# Altium PCB Vibration_Datalogger.PcbDoc (part 3 of 7)
Units mm, origin at the board's own origin, x right, y up, seen from the top; angles counter-clockwise.
Board outline 75.58 x 57.4 mm, 4 copper layers (Top Layer, Int1 (GND), Int2 (PWR), Bottom Layer), stack 1.44 mm thick; 126 components, 59 nets, 413 pads, 160 vias.
Unrouted connection lines stored in the file: 53.
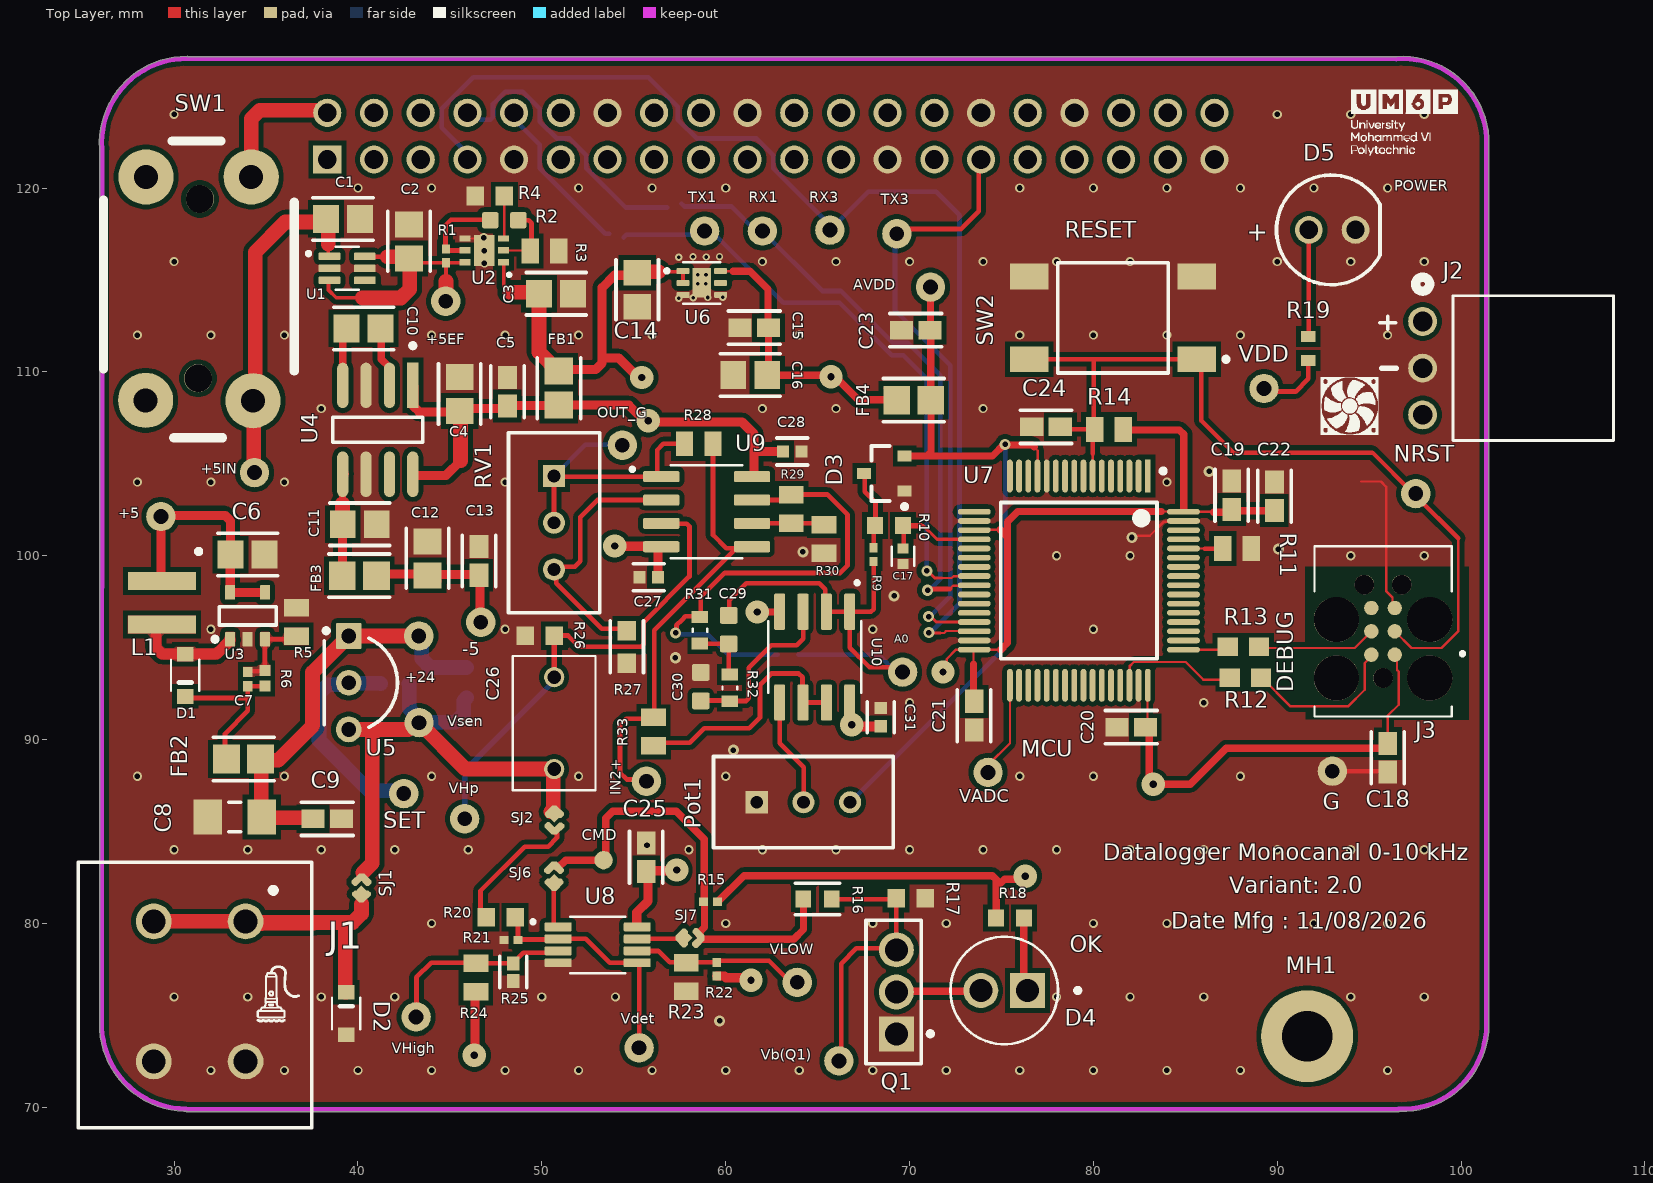
[diagram p0: Top Layer view]

## Part data (continued)
D3: "DIODE ARR SCHOTT 40V 200MA SOT23", Average Rectified Current=120mA, Capacitance=5pF, Case/Package=SOT, Forward Voltage=380mV, Max Forward Surge Current (Ifsm)=200mA, Max Operating Temperature=150°C, Max Power Dissipation=250mW, Max Repetitive Reverse Voltage (Vrrm)=40V, Max Reverse Leakage Current=1µA, Min Operating Temperature=-55°C, Package Quantity=3000, Ratings=AEC-Q101, Reverse Standoff Voltage=30V, Supplier Part Number 1=BAS4004E6327HTSA1DKR-ND, China RoHS=Compliant, ComponentLink1Description=https://datasheet.octopart.com:443/BAS4004E6327HTSA1-Infineon-datasheet-38586392.pdf?src-supplier=Newark, ComponentLink1URL=https://datasheet.octopart.com:443/BAS4004E6327HTSA1-Infineon-datasheet-38586392.pdf?src-supplier=Newark, ComponentLink2Description=https://datasheet.octopart.com:443/BAS4004E6327HTSA1-Infineon-datasheet-5318301.pdf?src-supplier=_legacy+Avnet, ComponentLink2URL=https://datasheet.octopart.com:443/BAS4004E6327HTSA1-Infineon-datasheet-5318301.pdf?src-supplier=_legacy+Avnet, ComponentLink3Description=https://datasheet.octopart.com:443/BAS4004E6327-Infineon-datasheet-537799.pdf?src-supplier=Farnell, ComponentLink3URL=https://datasheet.octopart.com:443/BAS4004E6327-Infineon-datasheet-537799.pdf?src-supplier=Farnell, ComponentLink4Description=https://datasheet.octopart.com:443/BAS4004E6327-Infineon-datasheet-7537246.pdf?src-supplier=Farnell, ComponentLink4URL=https://datasheet.octopart.com:443/BAS4004E6327-Infineon-datasheet-7537246.pdf?src-supplier=Farnell, ComponentLink5Description=https://datasheet.octopart.com:443/BAS40-04-Infineon-datasheet-578246.pdf?src-supplier=Farnell, ComponentLink5URL=https://datasheet.octopart.com:443/BAS40-04-Infineon-datasheet-578246.pdf?src-supplier=Farnell, ComponentLink6Description=https://datasheet.octopart.com:443/BAS40-04-Infineon-datasheet-645037.pdf?src-supplier=Farnell, ComponentLink6URL=https://datasheet.octopart.com:443/BAS40-04-Infineon-datasheet-645037.pdf?src-supplier=Farnell, ComponentLink7Description=https://datasheet.octopart.com:443/BAS4004E6327-Infineon-datasheet-21681.pdf?src-supplier=DigiKey, ComponentLink7URL=https://datasheet.octopart.com:443/BAS4004E6327-Infineon-datasheet-21681.pdf?src-supplier=DigiKey, ComponentLink8Description=http://sigma.octopart.com:80/conflict_mineral_statement/Infineon-company-51.pdf?src-supplier=Compliance+Statements, ComponentLink8URL=http://sigma.octopart.com:80/conflict_mineral_statement/Infineon-company-51.pdf?src-supplier=Compliance+Statements, ComponentLink9Description=http://sigma.octopart.com:80/reach_statement/International-Rectifier-company-55.pdf?src-supplier=Compliance+Statements, ComponentLink9URL=http://sigma.octopart.com:80/reach_statement/International-Rectifier-company-55.pdf?src-supplier=Compliance+Statements, ComponentLink10Description=http://sigma.octopart.com:80/rohs_statement/International-Rectifier-company-54.pdf?src-supplier=Compliance+Statements, ComponentLink10URL=http://sigma.octopart.com:80/rohs_statement/International-Rectifier-company-54.pdf?src-supplier=Compliance+Statements, Contact Plating=Tin, Country of Origin="Austria, Mainland China", Element Configuration=Dual, Export Control Classification Number (ECCN) Code=EAR99, Forward Current=120mA, Halogen Free="Not Halogen Free", Harmonized Tariff Schedule (HTS) Code=8541.10.00.70, Height=900µm, Introduction Date=1996-02-01, Lead Free="Lead Free", Length=2.9mm, Lifecycle Status=Production, Max Output Current=120mA, Max Reverse Voltage (DC)=40V, Max Surge Current=200mA, Min Breakdown Voltage=40V, Mount="Surface Mount", Number of Elements=2, Number of Pins=3, Number of Terminals=3, Packaging="Tape & Reel", Peak Non-Repetitive Surge Current=200mA, Peak Reverse Current=1µA, Radiation Hardening=No, REACH SVHC=Yes, Recovery Time=100ps, Reverse Recovery Time=100ps, Reverse Voltage=40V, Schedule B="8541100070|8541100070|8541100070, 8541100080|8541100080|8541100080|8541100080|8541100080|8541100080|8541100080|8541100080|8541100080|8541100080|8541100080|8541100080|8541100080|8541100080|8541100080|8541100080|8541100080, 8541100080|8541100080|8541100080|8541100080|8541100080|8541100080|8541100080|8541100080|8541100080|8541100080|8541100080|8541100080|8541100080|8541100080|8541100080|8541100080|8541100080|8541100080, 8541100080|8541100080|8541100080|8541100080|8541100080|8541100080|8541100080|8541100080|8541100080|8541100080|8541100080|8541100080|8541100080|8541100080|8541100080|8541100080|8541100080|8541100080|8541100080", Supplier 1=DigiKey, Termination=SMD/SMT, Width=1.3mm
D4: "LED GREEN DIFFUSED T/H", Supplier Part Number 1=160-1142-ND, Supplier 1=DigiKey
D5: "Single Color LED, Blue, Diffused, T-1 3/4, 4.9mm", Case/Package=Radial, Color=Blue, Forward Current=100mA, Forward Voltage=3.2V, Manufacturer="Wurth Elektronik", Manufacturer Lifecycle Status=ACTIVE, Max Operating Temperature=85°C, Max Reverse Voltage (DC)=5V, Min Operating Temperature=-40°C, Supplier Part Number 1=732-5015-ND, Test Current=20mA, Category=LEDs, ComponentLink1Description=https://datasheet.octopart.com:443/151051BS04000-Wurth-Elektronik-datasheet-168474691.pdf?src-supplier=Wurth+Elektronik, ComponentLink1URL=https://datasheet.octopart.com:443/151051BS04000-Wurth-Elektronik-datasheet-168474691.pdf?src-supplier=Wurth+Elektronik, ComponentLink2Description=https://datasheet.octopart.com:443/151051BS04000-W%C3%BCrth-Elektronik-datasheet-41196471.pdf?src-supplier=Future+Electronics, ComponentLink2URL=https://datasheet.octopart.com:443/151051BS04000-W%C3%BCrth-Elektronik-datasheet-41196471.pdf?src-supplier=Future+Electronics, ComponentLink3Description=https://datasheet.octopart.com:443/151051BS04000-W%C3%BCrth-Elektronik-datasheet-15983823.pdf?src-supplier=HQonline, ComponentLink3URL=https://datasheet.octopart.com:443/151051BS04000-W%C3%BCrth-Elektronik-datasheet-15983823.pdf?src-supplier=HQonline, Dominant Wavelength=470nm, Height=8.6mm, Length=5mm, Lens Size=5mm, Lens Style="Circular, Diffused, Round", Lifecycle Status=Production, Luminous Intensity=500mcd, Manufacturer Part Number=151051BS04000, Mount="Through Hole", Packaging=Bulk, Peak Wavelength=465nm, REACH SVHC=Unknown, Supplier 1=DigiKey, Viewing Angle=40°, Wavelength=470nm, Width=5mm, YEOL="1 = Estimated lifetime > 10 years"
FB1 FB2 FB3: "FERRITE BEAD 220 OHM 0805 1LN", Case Code (Imperial)=0805, Case Code (Metric)=2012, Current=2A, DC Resistance (DCR)=50mΩ, Frequency=100MHz, Manufacturer=Murata, Manufacturer Package Identifier="0805 (2012 metric)", Max Operating Temperature=125°C, Min Operating Temperature=-55°C, Resistance=220Ω, Series Resistance=45mΩ, Supplier Part Number 1=490-1054-1-ND, Tolerance=25%, Case/Package=0805, Category="Ferrite Beads and Chips", ComponentLink1Description=https://datasheet.octopart.com:443/BLM21PG221SN1D-Murata-datasheet-114786051.pdf?src-supplier=Upverter, ComponentLink1URL=https://datasheet.octopart.com:443/BLM21PG221SN1D-Murata-datasheet-114786051.pdf?src-supplier=Upverter, ComponentLink2Description=https://datasheet.octopart.com:443/BLM21PG221SN1D-Murata-datasheet-12522583.pdf?src-supplier=Upverter, ComponentLink2URL=https://datasheet.octopart.com:443/BLM21PG221SN1D-Murata-datasheet-12522583.pdf?src-supplier=Upverter, ComponentLink3Description=https://datasheet.octopart.com:443/BLM21PG221SN1D-Murata-datasheet-10083551.pdf?src-supplier=Upverter, ComponentLink3URL=https://datasheet.octopart.com:443/BLM21PG221SN1D-Murata-datasheet-10083551.pdf?src-supplier=Upverter, ComponentLink4Description=https://datasheet.octopart.com:443/BLM21PG221SN1D-Murata-datasheet-8508678.pdf?src-supplier=Upverter, ComponentLink4URL=https://datasheet.octopart.com:443/BLM21PG221SN1D-Murata-datasheet-8508678.pdf?src-supplier=Upverter, ComponentLink5Description=https://datasheet.octopart.com:443/BLM21PG221SN1D-Murata-datasheet-166171482.pdf?src-supplier=IHS, ComponentLink5URL=https://datasheet.octopart.com:443/BLM21PG221SN1D-Murata-datasheet-166171482.pdf?src-supplier=IHS, ComponentLink6Description=https://datasheet.octopart.com:443/BLM21PG221SN1D-Murata-datasheet-11743916.pdf?src-supplier=SOS+electronic, ComponentLink6URL=https://datasheet.octopart.com:443/BLM21PG221SN1D-Murata-datasheet-11743916.pdf?src-supplier=SOS+electronic, ComponentLink7Description=https://datasheet.octopart.com:443/BLM21PG221SN1D-Murata-datasheet-37129980.pdf?src-supplier=element14+APAC, ComponentLink7URL=https://datasheet.octopart.com:443/BLM21PG221SN1D-Murata-datasheet-37129980.pdf?src-supplier=element14+APAC, ComponentLink8Description=https://datasheet.octopart.com:443/BLM21PG221SN1D-Murata-datasheet-53019.pdf?src-supplier=TME, ComponentLink8URL=https://datasheet.octopart.com:443/BLM21PG221SN1D-Murata-datasheet-53019.pdf?src-supplier=TME, ComponentLink9Description=https://datasheet.octopart.com:443/BLM21PG221SN1D-Murata-datasheet-135086726.pdf?src-supplier=TME, ComponentLink9URL=https://datasheet.octopart.com:443/BLM21PG221SN1D-Murata-datasheet-135086726.pdf?src-supplier=TME, ComponentLink10Description=https://datasheet.octopart.com:443/BLM21PG221SN1D-Murata-datasheet-8359900.pdf?src-supplier=_legacy+Avnet, ComponentLink10URL=https://datasheet.octopart.com:443/BLM21PG221SN1D-Murata-datasheet-8359900.pdf?src-supplier=_legacy+Avnet, ComponentLink11Description=https://datasheet.octopart.com:443/BLM21PG221SN1D-Murata-datasheet-554271.pdf?src-supplier=_legacy+Avnet, ComponentLink11URL=https://datasheet.octopart.com:443/BLM21PG221SN1D-Murata-datasheet-554271.pdf?src-supplier=_legacy+Avnet, ComponentLink12Description=https://datasheet.octopart.com:443/BLM21PG221SN1D-Murata-datasheet-141258121.pdf?src-supplier=Ciiva, ComponentLink12URL=https://datasheet.octopart.com:443/BLM21PG221SN1D-Murata-datasheet-141258121.pdf?src-supplier=Ciiva, ComponentLink13Description=https://datasheet.octopart.com:443/BLM21PG221SN1D-Murata-datasheet-138707416.pdf?src-supplier=Ciiva, ComponentLink13URL=https://datasheet.octopart.com:443/BLM21PG221SN1D-Murata-datasheet-138707416.pdf?src-supplier=Ciiva, ComponentLink14Description=https://datasheet.octopart.com:443/BLM21PG221SN1D-Murata-datasheet-83134203.pdf?src-supplier=Megastar, ComponentLink14URL=https://datasheet.octopart.com:443/BLM21PG221SN1D-Murata-datasheet-83134203.pdf?src-supplier=Megastar, ComponentLink15Description=https://datasheet.octopart.com:443/BLM21PG221SN1D-Murata-datasheet-62086381.pdf?src-supplier=Future+Electronics, ComponentLink15URL=https://datasheet.octopart.com:443/BLM21PG221SN1D-Murata-datasheet-62086381.pdf?src-supplier=Future+Electronics, ComponentLink16Description=https://datasheet.octopart.com:443/BLM21PG221SN1D-Murata-datasheet-14066484.pdf?src-supplier=iiiC, ComponentLink16URL=https://datasheet.octopart.com:443/BLM21PG221SN1D-Murata-datasheet-14066484.pdf?src-supplier=iiiC, ComponentLink17Description=https://datasheet.octopart.com:443/BLM21PG221SN1D-Murata-datasheet-8197962.pdf?src-supplier=Jameco, ComponentLink17URL=https://datasheet.octopart.com:443/BLM21PG221SN1D-Murata-datasheet-8197962.pdf?src-supplier=Jameco, ComponentLink18Description=https://datasheet.octopart.com:443/BLM21PG221SN1D-Murata-datasheet-153769.pdf?src-supplier=Mouser, ComponentLink18URL=https://datasheet.octopart.com:443/BLM21PG221SN1D-Murata-datasheet-153769.pdf?src-supplier=Mouser, ComponentLink19Description=http://sigma.octopart.com:80/reach_statement/Murata-company-16.pdf?src-supplier=Compliance+Statements, ComponentLink19URL=http://sigma.octopart.com:80/reach_statement/Murata-company-16.pdf?src-supplier=Compliance+Statements, Contact Plating=Tin, Core Material=Ferrite, Current Rating=2A, DC Current=2A, Depth=1.25mm, Height=850µm, Impedance=220Ω, Lead Free="Lead Free", Length=2mm, Lifecycle Status=Production, Manufacturer Part Number=BLM21PG221SN1D, Material="Ferrite, Steel", Max Current Rating=2A, Max DC Current=2A, Max Frequency=100MHz, Military Standard=Not, Mount="Surface Mount", Number of Circuits=1, Number of Lines=1, Number of Pins=2, Number of Terminals=2, Packaging="Tape and Reel", Radiation Hardening=No, REACH SVHC=Yes, RMS Current (Irms)=2A, Schedule B="8504500000, 8504500000|8504500000|8504500000|8504500000|8504500000", Shielding=Unshielded, Supplier 1=DigiKey, Termination=SMD/SMT, Test Frequency=100MHz, Width=1.25mm
FB4: library part CMP-0686-00639-3, "Chip Ferrite Bead, 0805, 600Ω @ 100MHz, 0.2Ω, 25%, 700mA", Case Code (Imperial)=0805, Case Code (Metric)=2012, Current Rating=600mA, DC Current=200mA, DC Resistance (DCR)=210mR, ESR (Equivalent Series Resistance)=600R, Frequency=100MHz, Max Current Rating=700mA, Max Operating Temperature=125°C, Min Operating Temperature=-55°C, Package Quantity=1, Temperature Coefficient=10ppm/°C, Tolerance=25%, Case/Package=0805, Conductor Material=Copper, Core Material=Ferrite, Depth=1.25mm, Height=0.85mm, Impedance=600R, Lead Free="Lead Free", Length=2mm, Material=Steel, Max DC Current=200mA, Number of Circuits=1, Number of Lines=1, Number of Pins=2, Packaging="Tape and Reel", Radiation Hardening=No, REACH SVHC="No SVHC", RoHS Compliant=Yes, Shielding=Unshielded, Termination=SMD/SMT, Test Frequency=100MHz, Width=1.25mm
J1: "WR-TBL Terminal block - Screwless Push IN - THT", Current Rating=10A, Manufacturer="Wurth Elektronik", Manufacturer Lifecycle Status=ACTIVE, Max Operating Temperature=120°C, Min Operating Temperature=-30°C, Supplier Part Number 1=732-11084-ND, Voltage Rating=300V, Category="Terminal Blocks", ComponentLink1Description=https://datasheet.octopart.com:443/691411410002-W%C3%BCrth-Elektronik-datasheet-117282770.pdf?src-supplier=HQonline, ComponentLink1URL=https://datasheet.octopart.com:443/691411410002-W%C3%BCrth-Elektronik-datasheet-117282770.pdf?src-supplier=HQonline, ComponentLink2Description=https://datasheet.octopart.com:443/691411410002-Wurth-Elektronik-datasheet-190368166.pdf?src-supplier=Wurth+Elektronik, ComponentLink2URL=https://datasheet.octopart.com:443/691411410002-Wurth-Elektronik-datasheet-190368166.pdf?src-supplier=Wurth+Elektronik, Contact Material="Nickel, Tin", Height=14mm, Lead Pitch=7.62mm, Length=14.24mm, Lifecycle Status=Production, Manufacturer Part Number=691411410002, Number of Contacts=2, Number of Pins=2, Number of Rows=1, Packaging=Box, Pitch=7.62mm, Supplier 1=DigiKey, YEOL="1 = Estimated lifetime > 10 years"
J2: "CONN HEADER R/A 3POS 2.54MM", Color=Black, Contact Resistance=20mΩ, Current Rating=4A, Insulation Resistance=50GΩ, Manufacturer Lifecycle Status=ACTIVE, Max Operating Temperature=75°C, Max Voltage Rating (DC)=250.25kV, Min Operating Temperature=-40°C, Ratings=CSA, Supplier Part Number 1=WM50015-03-ND, Voltage Rating=250V, China RoHS=Compliant, ComponentLink1Description=https://datasheet.octopart.com:443/22-28-8032-Molex-datasheet-158885819.pdf?src-supplier=Newark, ComponentLink1URL=https://datasheet.octopart.com:443/22-28-8032-Molex-datasheet-158885819.pdf?src-supplier=Newark, ComponentLink2Description=https://datasheet.octopart.com:443/22-28-8032-Molex-datasheet-193086131.pdf?src-supplier=JRH+Electronics, ComponentLink2URL=https://datasheet.octopart.com:443/22-28-8032-Molex-datasheet-193086131.pdf?src-supplier=JRH+Electronics, ComponentLink3Description=https://datasheet.octopart.com:443/22-28-8032-Molex-datasheet-16301320.pdf?src-supplier=Molex, ComponentLink3URL=https://datasheet.octopart.com:443/22-28-8032-Molex-datasheet-16301320.pdf?src-supplier=Molex, ComponentLink4Description=https://sigma.octopart.com:443/12577388/technical_drawing/Molex-22-28-8032.pdf?src-supplier=Molex, ComponentLink4URL=https://sigma.octopart.com:443/12577388/technical_drawing/Molex-22-28-8032.pdf?src-supplier=Molex, ComponentLink5Description=https://datasheet.octopart.com:443/022288032-Molex-datasheet-8335722.pdf?src-supplier=Molex, ComponentLink5URL=https://datasheet.octopart.com:443/022288032-Molex-datasheet-8335722.pdf?src-supplier=Molex, ComponentLink6Description=https://datasheet.octopart.com:443/22-28-8032-Molex-datasheet-154747357.pdf?src-supplier=Master+Electronics, ComponentLink6URL=https://datasheet.octopart.com:443/22-28-8032-Molex-datasheet-154747357.pdf?src-supplier=Master+Electronics, ComponentLink7Description=https://datasheet.octopart.com:443/22-28-8032-Molex-datasheet-140181327.pdf?src-supplier=RS+(Formerly+Allied+Electronics), ComponentLink7URL=https://datasheet.octopart.com:443/22-28-8032-Molex-datasheet-140181327.pdf?src-supplier=RS+(Formerly+Allied+Electronics), ComponentLink8Description=https://datasheet.octopart.com:443/22-28-8032-Molex-datasheet-120146392.pdf?src-supplier=RS+(Formerly+Allied+Electronics), ComponentLink8URL=https://datasheet.octopart.com:443/22-28-8032-Molex-datasheet-120146392.pdf?src-supplier=RS+(Formerly+Allied+Electronics), ComponentLink9Description=https://datasheet.octopart.com:443/22-28-8032-Molex-datasheet-62061378.pdf?src-supplier=RS+(Formerly+Allied+Electronics), ComponentLink9URL=https://datasheet.octopart.com:443/22-28-8032-Molex-datasheet-62061378.pdf?src-supplier=RS+(Formerly+Allied+Electronics), ComponentLink10Description=https://datasheet.octopart.com:443/22-28-8032-Molex-datasheet-62103598.pdf?src-supplier=Electro+Sonic, ComponentLink10URL=https://datasheet.octopart.com:443/22-28-8032-Molex-datasheet-62103598.pdf?src-supplier=Electro+Sonic, ComponentLink11Description=https://datasheet.octopart.com:443/22-28-8032-Molex-datasheet-37169007.pdf?src-supplier=Electro+Sonic, ComponentLink11URL=https://datasheet.octopart.com:443/22-28-8032-Molex-datasheet-37169007.pdf?src-supplier=Electro+Sonic, ComponentLink12Description=https://datasheet.octopart.com:443/22-28-8032-Molex-datasheet-23709161.pdf?src-supplier=Electro+Sonic, ComponentLink12URL=https://datasheet.octopart.com:443/22-28-8032-Molex-datasheet-23709161.pdf?src-supplier=Electro+Sonic, ComponentLink13Description=https://datasheet.octopart.com:443/0022288032-Molex-datasheet-11837251.pdf?src-supplier=Arrow+Electronics, ComponentLink13URL=https://datasheet.octopart.com:443/0022288032-Molex-datasheet-11837251.pdf?src-supplier=Arrow+Electronics, ComponentLink14Description=https://datasheet.octopart.com:443/22-28-8032-Molex-datasheet-147203.pdf?src-supplier=DigiKey, ComponentLink14URL=https://datasheet.octopart.com:443/22-28-8032-Molex-datasheet-147203.pdf?src-supplier=DigiKey, ComponentLink15Description=http://sigma.octopart.com:80/16301321/rohs_statement/Molex-22-28-8032.pdf?src-supplier=Compliance+Statements, ComponentLink15URL=http://sigma.octopart.com:80/16301321/rohs_statement/Molex-22-28-8032.pdf?src-supplier=Compliance+Statements, ComponentLink16Description=http://sigma.octopart.com:80/reach_statement/Molex-company-74.pdf?src-supplier=Compliance+Statements, ComponentLink16URL=http://sigma.octopart.com:80/reach_statement/Molex-company-74.pdf?src-supplier=Compliance+Statements, ComponentLink17Description=http://sigma.octopart.com:80/rohs_statement/Molex-company-73.pdf?src-supplier=Compliance+Statements, ComponentLink17URL=http://sigma.octopart.com:80/rohs_statement/Molex-company-73.pdf?src-supplier=Compliance+Statements, ComponentLink18Description=http://sigma.octopart.com:80/conflict_mineral_statement/Molex-company-72.pdf?src-supplier=Compliance+Statements, ComponentLink18URL=http://sigma.octopart.com:80/conflict_mineral_statement/Molex-company-72.pdf?src-supplier=Compliance+Statements, Connector Type="Male Pin", Contact Material=Brass, Contact Mating Length=6.1976mm, Contact Plating=Gold, Country of Origin=US, Export Control Classification Number (ECCN) Code=EAR99, Gender=Male, Glow Wire Compliant=Non-compliant, Harmonized Tariff Schedule (HTS) Code=8536.69.40.40, Housing Color=Black, Housing Material=Thermoplastic, Introduction Date=1994-12-01, Lead Free="Lead Free", Length=7.62mm, Lifecycle Status=Production, Mount="Through Hole", Number of Circuits=3, Number of Contacts=3, Number of Pins=3, Number of Positions=3, Number of Rows=1, Orientation="Right Angle", Packaging=Bulk, Pitch=2.54mm, Plating=Tin, Plating Thickness=381nm, REACH SVHC=Yes, Supplier 1=DigiKey, Terminal Pitch=2.54mm, Termination=Solder
J3: "6-pin Needle Adapter (8.06.16)"
J4: "CONN SOCKET 40POS 0.1 GOLD PCB", Supplier Part Number 1=SAM10459-ND, Supplier 1=DigiKey
L1: "10 µH Shielded Molded Inductor 2.7 A", Ambient Temperature Range High=85°C, Ambient Temperature Range Low=-40°C, Current Rating=2.7A, DC Resistance (DCR)=100.8mΩ, Inductance=10µH, Inductance Tolerance=20%, Manufacturer="Wurth Elektronik", Manufacturer Lifecycle Status=ACTIVE, Max Operating Temperature=125°C, Saturation Current=3A, Self Resonant Frequency=15MHz, Series Resistance=110mΩ, Supplier Part Number 1=732-11206-1-ND, Test Frequency=100kHz, Category="Fixed Inductors", ComponentLink1Description=https://datasheet.octopart.com:443/74438357100-Wurth-Elektronik-datasheet-168490252.pdf?src-supplier=Wurth+Elektronik, ComponentLink1URL=https://datasheet.octopart.com:443/74438357100-Wurth-Elektronik-datasheet-168490252.pdf?src-supplier=Wurth+Elektronik, ComponentLink2Description=https://datasheet.octopart.com:443/74438357100-W%C3%BCrth-Elektronik-datasheet-142051541.pdf?src-supplier=Upverter, ComponentLink2URL=https://datasheet.octopart.com:443/74438357100-W%C3%BCrth-Elektronik-datasheet-142051541.pdf?src-supplier=Upverter, ComponentLink3Description=https://datasheet.octopart.com:443/74438357100-W%C3%BCrth-Elektronik-datasheet-104453325.pdf?src-supplier=element14+APAC, ComponentLink3URL=https://datasheet.octopart.com:443/74438357100-W%C3%BCrth-Elektronik-datasheet-104453325.pdf?src-supplier=element14+APAC, Height=3.1mm, Length=4mm, Lifecycle Status=Production, Manufacturer Part Number=74438357100, Min Operating Temperature=-40°C, Number of Pins=2, RMS Current (Irms)=2.7A, Supplier 1=DigiKey, Tolerance=20%, Width=4mm, YEOL="1 = Estimated lifetime > 10 years"
MH1: "Mounting Holes M2.5 PTH", Diamétre externe=5mm, Diamétre interne=M2.5
Pot1 RV1: "TRIMMER 10K OHM 0.5W PC PIN TOP", Case Code (Imperial)=0603, Case Code (Metric)=1608, Color=Blue, Insulation Resistance=1GΩ, Manufacturer=Bourns, Max Operating Temperature=125°C, Max Power Dissipation=500mW, Min Operating Temperature=-55°C, Resistance=10kΩ, Supplier Part Number 1=3296W-103LF-ND, Temperature Coefficient=100ppm/°C, Tolerance=10%, Voltage Rating=75V, Voltage Rating (AC)=300V, Case/Package=0603, Category="Variable Resistors and Potentiometers", China RoHS=Non-Compliant, ComponentLink1Description=https://datasheet.octopart.com:443/3296W-1-103LF-Bourns-datasheet-154325949.pdf?src-supplier=Newark, ComponentLink1URL=https://datasheet.octopart.com:443/3296W-1-103LF-Bourns-datasheet-154325949.pdf?src-supplier=Newark, ComponentLink2Description=https://datasheet.octopart.com:443/3296W-1-103LF-Bourns-datasheet-134530165.pdf?src-supplier=Upverter, ComponentLink2URL=https://datasheet.octopart.com:443/3296W-1-103LF-Bourns-datasheet-134530165.pdf?src-supplier=Upverter, ComponentLink3Description=https://datasheet.octopart.com:443/3296W-1-103LF-Bourns-datasheet-8754025.pdf?src-supplier=Farnell, ComponentLink3URL=https://datasheet.octopart.com:443/3296W-1-103LF-Bourns-datasheet-8754025.pdf?src-supplier=Farnell, ComponentLink4Description=https://datasheet.octopart.com:443/3296W-1-103LF-Bourns-datasheet-9257.pdf?src-supplier=Farnell, ComponentLink4URL=https://datasheet.octopart.com:443/3296W-1-103LF-Bourns-datasheet-9257.pdf?src-supplier=Farnell, ComponentLink5Description=https://datasheet.octopart.com:443/3296W-1-103LF-Bourns-datasheet-8458046.pdf?src-supplier=Farnell, ComponentLink5URL=https://datasheet.octopart.com:443/3296W-1-103LF-Bourns-datasheet-8458046.pdf?src-supplier=Farnell, ComponentLink6Description=https://datasheet.octopart.com:443/3296W-1-103LF-Bourns-datasheet-6152.pdf?src-supplier=Farnell, ComponentLink6URL=https://datasheet.octopart.com:443/3296W-1-103LF-Bourns-datasheet-6152.pdf?src-supplier=Farnell, ComponentLink7Description=https://datasheet.octopart.com:443/3296W-1-103LF-Bourns-datasheet-528316.pdf?src-supplier=Farnell, ComponentLink7URL=https://datasheet.octopart.com:443/3296W-1-103LF-Bourns-datasheet-528316.pdf?src-supplier=Farnell, ComponentLink8Description=https://datasheet.octopart.com:443/3296W-1-103LF-Bourns-datasheet-62345832.pdf?src-supplier=element14+APAC, ComponentLink8URL=https://datasheet.octopart.com:443/3296W-1-103LF-Bourns-datasheet-62345832.pdf?src-supplier=element14+APAC, ComponentLink9Description=https://datasheet.octopart.com:443/3296W-1-103LF-Bourns-datasheet-25360155.pdf?src-supplier=Future+Electronics, ComponentLink9URL=https://datasheet.octopart.com:443/3296W-1-103LF-Bourns-datasheet-25360155.pdf?src-supplier=Future+Electronics, ComponentLink10Description=https://datasheet.octopart.com:443/3296W-1-103LF-Bourns-datasheet-154729564.pdf?src-supplier=Electro+Sonic, ComponentLink10URL=https://datasheet.octopart.com:443/3296W-1-103LF-Bourns-datasheet-154729564.pdf?src-supplier=Electro+Sonic, ComponentLink11Description=https://datasheet.octopart.com:443/3296W-1-103LF-Bourns-datasheet-8359740.pdf?src-supplier=_legacy+Avnet, ComponentLink11URL=https://datasheet.octopart.com:443/3296W-1-103LF-Bourns-datasheet-8359740.pdf?src-supplier=_legacy+Avnet, ComponentLink12Description=https://datasheet.octopart.com:443/3296W-1-103LF-Bourns-datasheet-170576125.pdf?src-supplier=Burklin+Elektronik, ComponentLink12URL=https://datasheet.octopart.com:443/3296W-1-103LF-Bourns-datasheet-170576125.pdf?src-supplier=Burklin+Elektronik, ComponentLink13Description=https://datasheet.octopart.com:443/3296W-1-103LF-Bourns-datasheet-14175298.pdf?src-supplier=iiiC, ComponentLink13URL=https://datasheet.octopart.com:443/3296W-1-103LF-Bourns-datasheet-14175298.pdf?src-supplier=iiiC, ComponentLink14Description=https://datasheet.octopart.com:443/3296W-1-103LF-Bourns-datasheet-7277272.pdf?src-supplier=Jameco, ComponentLink14URL=https://datasheet.octopart.com:443/3296W-1-103LF-Bourns-datasheet-7277272.pdf?src-supplier=Jameco, ComponentLink15Description=http://sigma.octopart.com:80/conflict_mineral_statement/Bourns-company-36.pdf?src-supplier=Compliance+Statements, ComponentLink15URL=http://sigma.octopart.com:80/conflict_mineral_statement/Bourns-company-36.pdf?src-supplier=Compliance+Statements, Composition=Cermet, Contact Plating=Tin, Country of Origin="Costa Rica", Depth=4.83mm, Export Control Classification Number (ECCN) Code=EAR99, Harmonized Tariff Schedule (HTS) Code=8533.40.80.50, Height=10.03mm, Introduction Date=2004-09-13, Lead Diameter=510µm, Lead Free="Lead Free", Lead Length=6.4mm, Length=9.53mm, Lifecycle Status=Production, Manufacturer Part Number=3296W-1-103LF, Military Standard=Not, Mount="Surface Mount", Number of Terminals=3, Number of Turns=25, Packaging="Tape and Reel", Power Rating=500mW, Radiation Hardening=No, REACH SVHC=No, Schedule B="8533400080, 8533400080|8533400080, 8533400080|8533400080|8533400080, 8533400080|8533400080|8533400080|8533400080", Supplier 1=DigiKey, Taper=Linear, Termination=Pin, Voltage Rating (DC)=300V, Weight=2.012816mg, Width=4.83mm, Working Voltage=300V
Q1: library part CMP-1048-01269-2, Case/Package=TO-225, Collector Base Voltage (VCBO)=80V, Collector Emitter Saturation Voltage=500mV, Current Rating=1.5A, Emitter Base Voltage (VEBO)=5V, Manufacturer Lifecycle Status=ACTIVE, Max Junction Temperature (Tj)=150°C, Max Power Dissipation=1.25W, Min Operating Temperature=-55°C, Collector Emitter Breakdown Voltage=80V, Collector Emitter Voltage (VCEO)=80V, Contact Plating=Tin, Element Configuration=Single, Height=11.04mm, hFE Min=25, Lead Free="Lead Free", Length=7.74mm, Lifecycle Status=Production, Max Collector Current=1.5A, Max Operating Temperature=150°C, NexarPartId=354669, Number of Elements=1, Number of Pins=3, Packaging=Bulk, Polarity=NPN, Power Dissipation=1.25W, Radiation Hardening=No, REACH SVHC="No SVHC", RoHS=Compliant, Schedule B="8541290080, 8541290080", Voltage Rating (DC)=80V, Weight=4.535924g, Width=2.66mm
R1: "RES SMD 33K OHM 0.1% 1/16W 0402", Case Code (Imperial)=0402, Case Code (Metric)=1005, Manufacturer=Panasonic, Manufacturer Lifecycle Status=ACTIVE, Manufacturer Part Number=ERA2AEB333X, Max Operating Temperature=155°C, Max Power Dissipation=63mW, Min Operating Temperature=-55°C, Ratings=AEC-Q200, Resistance=33kΩ, Temperature Coefficient=25ppm/°C, Tolerance=0.1%, Voltage Rating=25V, Working Voltage=50V, Case/Package=0402, Category="Chip SMD Resistors", China RoHS=Non-Compliant, ComponentLink1Description=https://datasheet.octopart.com:443/ERA2AEB333X-Panasonic-datasheet-62287448.pdf?src-supplier=element14+APAC, ComponentLink1URL=https://datasheet.octopart.com:443/ERA2AEB333X-Panasonic-datasheet-62287448.pdf?src-supplier=element14+APAC, ComponentLink2Description=https://datasheet.octopart.com:443/ERA-2AEB333X-Panasonic-datasheet-61114971.pdf?src-supplier=element14+APAC, ComponentLink2URL=https://datasheet.octopart.com:443/ERA-2AEB333X-Panasonic-datasheet-61114971.pdf?src-supplier=element14+APAC, ComponentLink3Description=https://datasheet.octopart.com:443/ERA2AEB333X-Panasonic-datasheet-13266200.pdf?src-supplier=Electro+Sonic, ComponentLink3URL=https://datasheet.octopart.com:443/ERA2AEB333X-Panasonic-datasheet-13266200.pdf?src-supplier=Electro+Sonic, ComponentLink4Description=https://datasheet.octopart.com:443/ERA-2AEB333X-Panasonic-datasheet-33006989.pdf?src-supplier=Electro+Sonic, ComponentLink4URL=https://datasheet.octopart.com:443/ERA-2AEB333X-Panasonic-datasheet-33006989.pdf?src-supplier=Electro+Sonic, ComponentLink5Description=https://datasheet.octopart.com:443/ERA-2AEB333X-Panasonic-datasheet-46744048.pdf?src-supplier=Electro+Sonic, ComponentLink5URL=https://datasheet.octopart.com:443/ERA-2AEB333X-Panasonic-datasheet-46744048.pdf?src-supplier=Electro+Sonic, ComponentLink6Description=https://datasheet.octopart.com:443/ERA2AEB333X-Panasonic-datasheet-12510007.pdf?src-supplier=Future+Electronics, ComponentLink6URL=https://datasheet.octopart.com:443/ERA2AEB333X-Panasonic-datasheet-12510007.pdf?src-supplier=Future+Electronics, ComponentLink7Description=https://datasheet.octopart.com:443/ERA2AEB333X-Panasonic-datasheet-11763931.pdf?src-supplier=Future+Electronics, ComponentLink7URL=https://datasheet.octopart.com:443/ERA2AEB333X-Panasonic-datasheet-11763931.pdf?src-supplier=Future+Electronics, ComponentLink8Description=https://datasheet.octopart.com:443/ERA2AEB333X-Panasonic-datasheet-10840895.pdf?src-supplier=Future+Electronics, ComponentLink8URL=https://datasheet.octopart.com:443/ERA2AEB333X-Panasonic-datasheet-10840895.pdf?src-supplier=Future+Electronics, ComponentLink9Description=https://datasheet.octopart.com:443/ERA2AEB333X-Panasonic-datasheet-8367715.pdf?src-supplier=Future+Electronics, ComponentLink9URL=https://datasheet.octopart.com:443/ERA2AEB333X-Panasonic-datasheet-8367715.pdf?src-supplier=Future+Electronics, ComponentLink10Description=https://datasheet.octopart.com:443/ERA2AEB333X-Panasonic-datasheet-5392808.pdf?src-supplier=Future+Electronics, ComponentLink10URL=https://datasheet.octopart.com:443/ERA2AEB333X-Panasonic-datasheet-5392808.pdf?src-supplier=Future+Electronics, ComponentLink11Description=https://datasheet.octopart.com:443/ERA2AEB333X-Panasonic-datasheet-136531316.pdf?src-supplier=Newark, ComponentLink11URL=https://datasheet.octopart.com:443/ERA2AEB333X-Panasonic-datasheet-136531316.pdf?src-supplier=Newark, ComponentLink12Description=https://datasheet.octopart.com:443/ERA2AEB333X-Panasonic---ECG-datasheet-22087624.pdf?src-supplier=Newark, ComponentLink12URL=https://datasheet.octopart.com:443/ERA2AEB333X-Panasonic---ECG-datasheet-22087624.pdf?src-supplier=Newark, ComponentLink13Description=https://datasheet.octopart.com:443/ERA2AEB333X-Panasonic-datasheet-184398012.pdf?src-supplier=JRH+Electronics, ComponentLink13URL=https://datasheet.octopart.com:443/ERA2AEB333X-Panasonic-datasheet-184398012.pdf?src-supplier=JRH+Electronics, ComponentLink14Description=https://datasheet.octopart.com:443/ERA-2AEB333X-Panasonic-datasheet-154766165.pdf?src-supplier=Master+Electronics, ComponentLink14URL=https://datasheet.octopart.com:443/ERA-2AEB333X-Panasonic-datasheet-154766165.pdf?src-supplier=Master+Electronics, ComponentLink15Description=https://datasheet.octopart.com:443/ERA2AEB333X-Panasonic-datasheet-5311861.pdf?src-supplier=element14, ComponentLink15URL=https://datasheet.octopart.com:443/ERA2AEB333X-Panasonic-datasheet-5311861.pdf?src-supplier=element14, ComponentLink16Description=https://datasheet.octopart.com:443/ERA2AEB333X-Panasonic-datasheet-188913046.pdf?src-supplier=TME, ComponentLink16URL=https://datasheet.octopart.com:443/ERA2AEB333X-Panasonic-datasheet-188913046.pdf?src-supplier=TME, ComponentLink17Description=https://datasheet.octopart.com:443/ERA2AEB333X-Panasonic-datasheet-182736486.pdf?src-supplier=HQonline, ComponentLink17URL=https://datasheet.octopart.com:443/ERA2AEB333X-Panasonic-datasheet-182736486.pdf?src-supplier=HQonline, ComponentLink18Description=https://sigma.octopart.com:443/150570796/technical_drawing/Panasonic-ERA2AEB333X.pdf?src-supplier=Panasonic+SCT, ComponentLink18URL=https://sigma.octopart.com:443/150570796/technical_drawing/Panasonic-ERA2AEB333X.pdf?src-supplier=Panasonic+SCT, ComponentLink19Description=https://datasheet.octopart.com/ERA2AEB333X-Panasonic-datasheet-78375410.pdf, ComponentLink19URL=https://datasheet.octopart.com/ERA2AEB333X-Panasonic-datasheet-78375410.pdf, ComponentLink20Description=https://datasheet.octopart.com:443/ERA2AEB333X-Panasonic-datasheet-10050158.pdf?src-supplier=Arrow+Electronics, ComponentLink20URL=https://datasheet.octopart.com:443/ERA2AEB333X-Panasonic-datasheet-10050158.pdf?src-supplier=Arrow+Electronics, ComponentLink21Description=https://datasheet.octopart.com:443/ERA2AEB333X-Panasonic-datasheet-7542722.pdf?src-supplier=Farnell, ComponentLink21URL=https://datasheet.octopart.com:443/ERA2AEB333X-Panasonic-datasheet-7542722.pdf?src-supplier=Farnell, Composition="Thin Film", Contact Plating=Tin, Depth=500µm, Height=350µm, Lead Free="Lead Free", Length=1mm, Lifecycle Status=Production, Military Standard=Not, Mount="Surface Mount", Number of Pins=2, Number of Terminals=2, Number of Terminations=2, Packaging="Cut Tape", Part Series="Thin Film Chip Resistors, High Reliability Type", Power Rating=63mW, Radiation Hardening=No, REACH SVHC=Yes, Schedule B="8533210045, 8533210045|8533210045|8533210045|8533210045|8533210045", Supplier 1=Newark, Supplier Part Number 1=ERA2AEB333X, Termination=SMD/SMT, Voltage Rating (DC)=25V, Width=500µm
R2: "RES 1.8K OHM 1% 1/10W 0603", Case Code (Imperial)=0603, Max Operating Temperature=155°C, Max Power Dissipation=100mW, Min Operating Temperature=-55°C, Resistance=1.8kΩ, Supplier Part Number 1=311-1.80KHRDKR-ND, Temperature Coefficient=100ppm/°C, Tolerance=1%, Voltage Rating=75V, Voltage Rating (AC)=50V, Case/Package=0603, China RoHS=Non-Compliant, ComponentLink1Description=https://datasheet.octopart.com:443/RC0603FR-071K8L-Yageo-datasheet-175887523.pdf?src-supplier=IHS, ComponentLink1URL=https://datasheet.octopart.com:443/RC0603FR-071K8L-Yageo-datasheet-175887523.pdf?src-supplier=IHS, ComponentLink2Description=https://datasheet.octopart.com:443/RC0603FR-071K8L-Yageo-datasheet-141265859.pdf?src-supplier=Upverter, ComponentLink2URL=https://datasheet.octopart.com:443/RC0603FR-071K8L-Yageo-datasheet-141265859.pdf?src-supplier=Upverter, ComponentLink3Description=https://datasheet.octopart.com:443/RC0603FR-071K8L-Yageo-datasheet-103092701.pdf?src-supplier=Upverter, ComponentLink3URL=https://datasheet.octopart.com:443/RC0603FR-071K8L-Yageo-datasheet-103092701.pdf?src-supplier=Upverter, ComponentLink4Description=https://datasheet.octopart.com:443/RC0603FR-071K8L-Yageo-Group-datasheet-190305687.pdf?src-supplier=Future+Electronics, ComponentLink4URL=https://datasheet.octopart.com:443/RC0603FR-071K8L-Yageo-Group-datasheet-190305687.pdf?src-supplier=Future+Electronics, ComponentLink5Description=https://datasheet.octopart.com:443/RC0603FR-071K8L-Yageo-datasheet-164759695.pdf?src-supplier=Future+Electronics, ComponentLink5URL=https://datasheet.octopart.com:443/RC0603FR-071K8L-Yageo-datasheet-164759695.pdf?src-supplier=Future+Electronics, ComponentLink6Description=https://datasheet.octopart.com:443/RC0603FR-071K8L-Yageo-datasheet-137700087.pdf?src-supplier=Future+Electronics, ComponentLink6URL=https://datasheet.octopart.com:443/RC0603FR-071K8L-Yageo-datasheet-137700087.pdf?src-supplier=Future+Electronics, ComponentLink7Description=https://datasheet.octopart.com:443/RC0603FR-071K8L-Yageo-datasheet-27584510.pdf?src-supplier=Future+Electronics, ComponentLink7URL=https://datasheet.octopart.com:443/RC0603FR-071K8L-Yageo-datasheet-27584510.pdf?src-supplier=Future+Electronics, ComponentLink8Description=https://datasheet.octopart.com:443/RC0603FR-071K8L-Yageo-datasheet-15599030.pdf?src-supplier=Future+Electronics, ComponentLink8URL=https://datasheet.octopart.com:443/RC0603FR-071K8L-Yageo-datasheet-15599030.pdf?src-supplier=Future+Electronics, ComponentLink9Description=https://datasheet.octopart.com:443/RC0603FR-071K8L-Yageo-datasheet-12596169.pdf?src-supplier=Future+Electronics, ComponentLink9URL=https://datasheet.octopart.com:443/RC0603FR-071K8L-Yageo-datasheet-12596169.pdf?src-supplier=Future+Electronics, ComponentLink10Description=https://datasheet.octopart.com:443/RC0603FR-071K8L-Yageo-datasheet-8324193.pdf?src-supplier=Future+Electronics, ComponentLink10URL=https://datasheet.octopart.com:443/RC0603FR-071K8L-Yageo-datasheet-8324193.pdf?src-supplier=Future+Electronics, ComponentLink11Description=https://datasheet.octopart.com:443/RC0603FR-071K8L-Yageo-datasheet-8328172.pdf?src-supplier=Newark, ComponentLink11URL=https://datasheet.octopart.com:443/RC0603FR-071K8L-Yageo-datasheet-8328172.pdf?src-supplier=Newark, ComponentLink12Description=https://datasheet.octopart.com:443/RC0603FR-071K8L-Yageo-datasheet-62067350.pdf?src-supplier=Newark, ComponentLink12URL=https://datasheet.octopart.com:443/RC0603FR-071K8L-Yageo-datasheet-62067350.pdf?src-supplier=Newark, ComponentLink13Description=https://datasheet.octopart.com:443/RC0603FR-071K8L-Yageo-Group-datasheet-176638170.pdf?src-supplier=Newark, ComponentLink13URL=https://datasheet.octopart.com:443/RC0603FR-071K8L-Yageo-Group-datasheet-176638170.pdf?src-supplier=Newark, ComponentLink14Description=https://datasheet.octopart.com:443/RC0603FR-071K8L-Yageo-datasheet-34211833.pdf?src-supplier=Farnell, ComponentLink14URL=https://datasheet.octopart.com:443/RC0603FR-071K8L-Yageo-datasheet-34211833.pdf?src-supplier=Farnell, ComponentLink15Description=https://datasheet.octopart.com:443/RC0603FR-071K8L-Yageo-datasheet-148775077.pdf?src-supplier=TME, ComponentLink15URL=https://datasheet.octopart.com:443/RC0603FR-071K8L-Yageo-datasheet-148775077.pdf?src-supplier=TME, ComponentLink16Description=https://datasheet.octopart.com:443/RC0603FR-071K8L-Yageo-datasheet-79472498.pdf?src-supplier=Megastar, ComponentLink16URL=https://datasheet.octopart.com:443/RC0603FR-071K8L-Yageo-datasheet-79472498.pdf?src-supplier=Megastar, ComponentLink17Description=https://datasheet.octopart.com/RC0603FR-071K8L-Yageo-datasheet-73766026.pdf, ComponentLink17URL=https://datasheet.octopart.com/RC0603FR-071K8L-Yageo-datasheet-73766026.pdf, ComponentLink18Description=https://datasheet.octopart.com:443/RC0603FR-071K8L-Yageo-datasheet-30459151.pdf?src-supplier=Seeed+Studio, ComponentLink18URL=https://datasheet.octopart.com:443/RC0603FR-071K8L-Yageo-datasheet-30459151.pdf?src-supplier=Seeed+Studio, ComponentLink19Description=https://datasheet.octopart.com:443/RC0603FR-071K8L-Yageo-datasheet-118562.pdf?src-supplier=DigiKey, ComponentLink19URL=https://datasheet.octopart.com:443/RC0603FR-071K8L-Yageo-datasheet-118562.pdf?src-supplier=DigiKey, ComponentLink20Description=http://sigma.octopart.com:80/conflict_mineral_statement/Yageo-company-3.pdf?src-supplier=Compliance+Statements, ComponentLink20URL=http://sigma.octopart.com:80/conflict_mineral_statement/Yageo-company-3.pdf?src-supplier=Compliance+Statements, ComponentLink21Description=http://sigma.octopart.com:80/rohs_statement/Yageo-company-2.pdf?src-supplier=Compliance+Statements, ComponentLink21URL=http://sigma.octopart.com:80/rohs_statement/Yageo-company-2.pdf?src-supplier=Compliance+Statements, Composition="Thick Film", Contact Plating=Tin, Depth=800µm, Features="Moisture Resistant", Height=450µm, Lead Free="Lead Free", Length=1.6mm, Lifecycle Status=Production, Military Standard=Not, Mount="Surface Mount", Number of Pins=2, Number of Terminals=2, Number of Terminations=2, Packaging="Cut Tape", Power Rating=100mW, Radiation Hardening=No, REACH SVHC=Yes, Schedule B="8533210045, 8533210045|8533210045, 8533210045|8533210045|8533210045, 8533210045|8533210045|8533210045|8533210045", Supplier 1=DigiKey, Termination=SMD/SMT, Voltage Rating (DC)=50V, Width=800µm, Working Voltage=75V
R3 R5 R11 R14 R23 R24 R28 R29 R30 R33: "RES SMD 10K OHM 0.05% 1/8W 0805", Case Code (Imperial)=0805, Case Code (Metric)=2012, Max Operating Temperature=155°C, Max Power Dissipation=125mW, Min Operating Temperature=-55°C, Power Dissipation=100mW, Resistance=10kΩ, Supplier Part Number 1=RG20N10.0KWCT-ND, Temperature Coefficient=10ppm/°C, Tolerance=0.05%, Voltage Rating=100V, Voltage Rating (DC)=150V, Case/Package=0805, ComponentLink1Description=https://datasheet.octopart.com:443/RG2012N-103-W-T1-Susumu-datasheet-62085167.pdf?src-supplier=Upverter, ComponentLink1URL=https://datasheet.octopart.com:443/RG2012N-103-W-T1-Susumu-datasheet-62085167.pdf?src-supplier=Upverter, ComponentLink2Description=https://datasheet.octopart.com:443/RG2012N-103-W-T1-Susumu-datasheet-12510102.pdf?src-supplier=IHS, ComponentLink2URL=https://datasheet.octopart.com:443/RG2012N-103-W-T1-Susumu-datasheet-12510102.pdf?src-supplier=IHS, ComponentLink3Description=https://datasheet.octopart.com/RG2012N-103-W-T1-Susumu-datasheet-12509734.pdf, ComponentLink3URL=https://datasheet.octopart.com/RG2012N-103-W-T1-Susumu-datasheet-12509734.pdf, ComponentLink4Description=https://datasheet.octopart.com:443/RG2012N-103-W-T1-Susumu-datasheet-80324142.pdf?src-supplier=Future+Electronics, ComponentLink4URL=https://datasheet.octopart.com:443/RG2012N-103-W-T1-Susumu-datasheet-80324142.pdf?src-supplier=Future+Electronics, ComponentLink5Description=https://datasheet.octopart.com:443/RG2012N-103-W-T1-Susumu-datasheet-12510050.pdf?src-supplier=Future+Electronics, ComponentLink5URL=https://datasheet.octopart.com:443/RG2012N-103-W-T1-Susumu-datasheet-12510050.pdf?src-supplier=Future+Electronics, ComponentLink6Description=https://datasheet.octopart.com:443/RG2012N-103-W-T1-Susumu-datasheet-8324184.pdf?src-supplier=Future+Electronics, ComponentLink6URL=https://datasheet.octopart.com:443/RG2012N-103-W-T1-Susumu-datasheet-8324184.pdf?src-supplier=Future+Electronics, ComponentLink7Description=https://datasheet.octopart.com:443/RG2012N-103-W-T1-Susumu-datasheet-118552.pdf?src-supplier=DigiKey, ComponentLink7URL=https://datasheet.octopart.com:443/RG2012N-103-W-T1-Susumu-datasheet-118552.pdf?src-supplier=DigiKey, ComponentLink8Description=https://datasheet.octopart.com:443/RG2012N-103-W-T1-Susumu-datasheet-123117.pdf?src-supplier=Factory+Futures, ComponentLink8URL=https://datasheet.octopart.com:443/RG2012N-103-W-T1-Susumu-datasheet-123117.pdf?src-supplier=Factory+Futures, Composition="Thin Film", Country of Origin="Mainland China, Japan", Export Control Classification Number (ECCN) Code=EAR99, Features="Automotive AEC-Q200", Harmonized Tariff Schedule (HTS) Code=8533.21.00.30, Height=508µm, Introduction Date=2007-03-26, Lead Free="Lead Free", Length=2.0066mm, Lifecycle Status=Obsolete, Mount="Surface Mount", Number of Terminals=2, Number of Terminations=2, Packaging="Cut Tape", Schedule B="8533210045, 8533210045|8533210045|8533210045|8533210045|8533210045", Supplier 1=DigiKey, Termination=SMD/SMT, Width=1.2446mm, Working Voltage=100V
R4 R17 R20 R26: "RES SMD 100KOHM 0.05% 1/10W 0603", Case Code (Imperial)=0603, Case Code (Metric)=1608, Manufacturer=Panasonic, Manufacturer Lifecycle Status=ACTIVE, Manufacturer Part Number=ERA3ARW104V, Max Operating Temperature=155°C, Max Power Dissipation=100mW, Min Operating Temperature=-55°C, Ratings=AEC-Q200, Resistance=100kΩ, Supplier Part Number 1=P100KBECT-ND, Temperature Coefficient=10ppm/°C, Tolerance=0.05%, Voltage Rating=150V, Voltage Rating (DC)=75V, Case/Package=0603, Category="Chip SMD Resistors", ComponentLink1Description=https://datasheet.octopart.com:443/ERA3ARW104V-Panasonic-datasheet-181959660.pdf?src-supplier=IHS, ComponentLink1URL=https://datasheet.octopart.com:443/ERA3ARW104V-Panasonic-datasheet-181959660.pdf?src-supplier=IHS, ComponentLink2Description=https://datasheet.octopart.com:443/ERA3ARW104V-Panasonic-datasheet-62287448.pdf?src-supplier=Future+Electronics, ComponentLink2URL=https://datasheet.octopart.com:443/ERA3ARW104V-Panasonic-datasheet-62287448.pdf?src-supplier=Future+Electronics, ComponentLink3Description=https://datasheet.octopart.com:443/ERA3ARW104V-Panasonic-datasheet-136531316.pdf?src-supplier=Newark, ComponentLink3URL=https://datasheet.octopart.com:443/ERA3ARW104V-Panasonic-datasheet-136531316.pdf?src-supplier=Newark, ComponentLink4Description=https://datasheet.octopart.com:443/ERA3ARW104V-Panasonic-datasheet-5310081.pdf?src-supplier=Newark, ComponentLink4URL=https://datasheet.octopart.com:443/ERA3ARW104V-Panasonic-datasheet-5310081.pdf?src-supplier=Newark, ComponentLink5Description=https://datasheet.octopart.com:443/ERA-3ARW104V-Panasonic-datasheet-154766165.pdf?src-supplier=Master+Electronics, ComponentLink5URL=https://datasheet.octopart.com:443/ERA-3ARW104V-Panasonic-datasheet-154766165.pdf?src-supplier=Master+Electronics, ComponentLink6Description=https://datasheet.octopart.com:443/ERA3ARW104V-Panasonic-datasheet-13266200.pdf?src-supplier=Electro+Sonic, ComponentLink6URL=https://datasheet.octopart.com:443/ERA3ARW104V-Panasonic-datasheet-13266200.pdf?src-supplier=Electro+Sonic, ComponentLink7Description=https://datasheet.octopart.com:443/ERA-3ARW104V-Panasonic-datasheet-33006989.pdf?src-supplier=Electro+Sonic, ComponentLink7URL=https://datasheet.octopart.com:443/ERA-3ARW104V-Panasonic-datasheet-33006989.pdf?src-supplier=Electro+Sonic, ComponentLink8Description=https://sigma.octopart.com:443/150570796/technical_drawing/Panasonic-ERA3ARW104V.pdf?src-supplier=Panasonic+SCT, ComponentLink8URL=https://sigma.octopart.com:443/150570796/technical_drawing/Panasonic-ERA3ARW104V.pdf?src-supplier=Panasonic+SCT, ComponentLink9Description=https://datasheet.octopart.com/ERA3ARW104V-Panasonic-datasheet-78375410.pdf, ComponentLink9URL=https://datasheet.octopart.com/ERA3ARW104V-Panasonic-datasheet-78375410.pdf, Composition="Metal Film, Thin Film", Contact Plating=Tin, Depth=800µm, Height=450µm, Lead Free="Lead Free", Length=1.6mm, Lifecycle Status=Production, Military Standard=Not, Mount="Surface Mount", Number of Pins=2, Number of Terminals=2, Number of Terminations=2, Packaging="Cut Tape", Part Series="Thin Film Chip Resistors, High Reliability Type", Power Dissipation=100mW, Power Rating=100mW, Radiation Hardening=No, REACH SVHC=Yes, Schedule B="8533210045, 8533210045|8533210045|8533210045|8533210045|8533210045|8533210045|8533210045|8533210045|8533210045|8533210045|8533210045|8533210045|8533210045|8533210045|8533210045|8533210045|8533210045|8533210045|8533210045|8533210045|8533210045|8533210045|8533210045|85", Supplier 1=DigiKey, Width=800µm, Working Voltage=75V